# Altium PCB GP315.PcbDoc
Units mm, origin at the board's own origin, x right, y up, seen from the top; angles counter-clockwise.
Board outline 47.62 x 30.74 mm, 2 copper layers (Top Layer, Bottom Layer); 18 components, 15 nets, 48 pads, 31 vias.
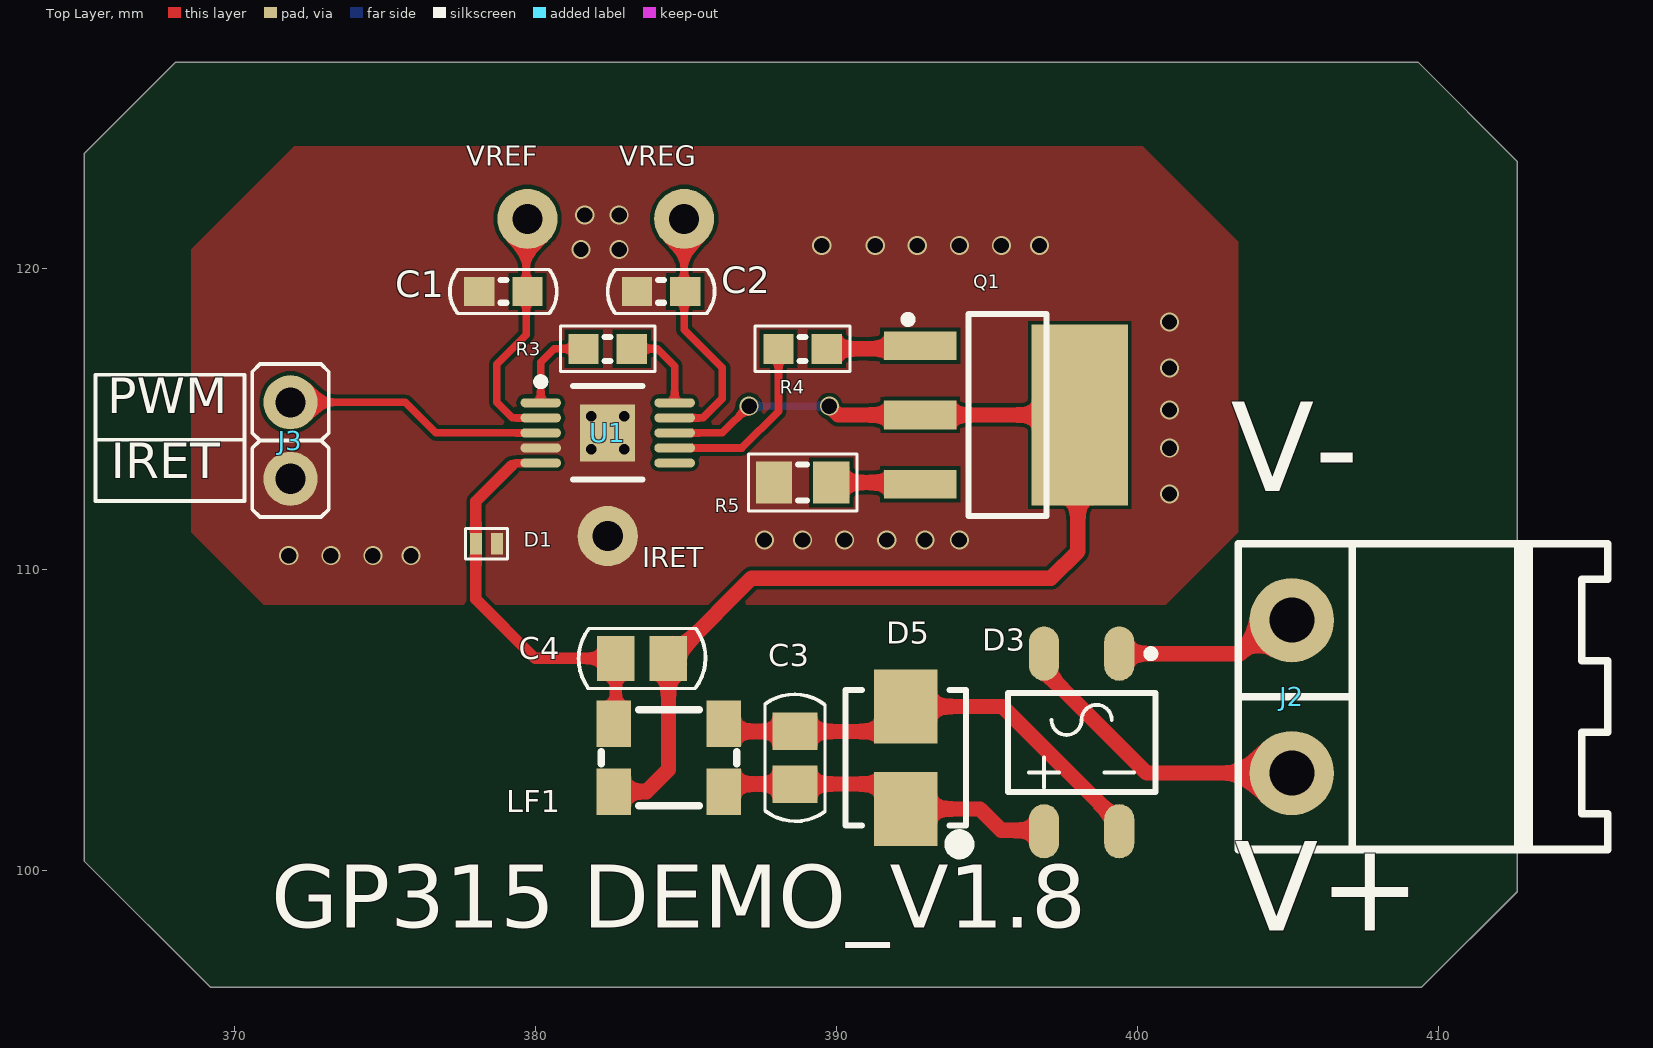
[diagram p0: Top Layer view]
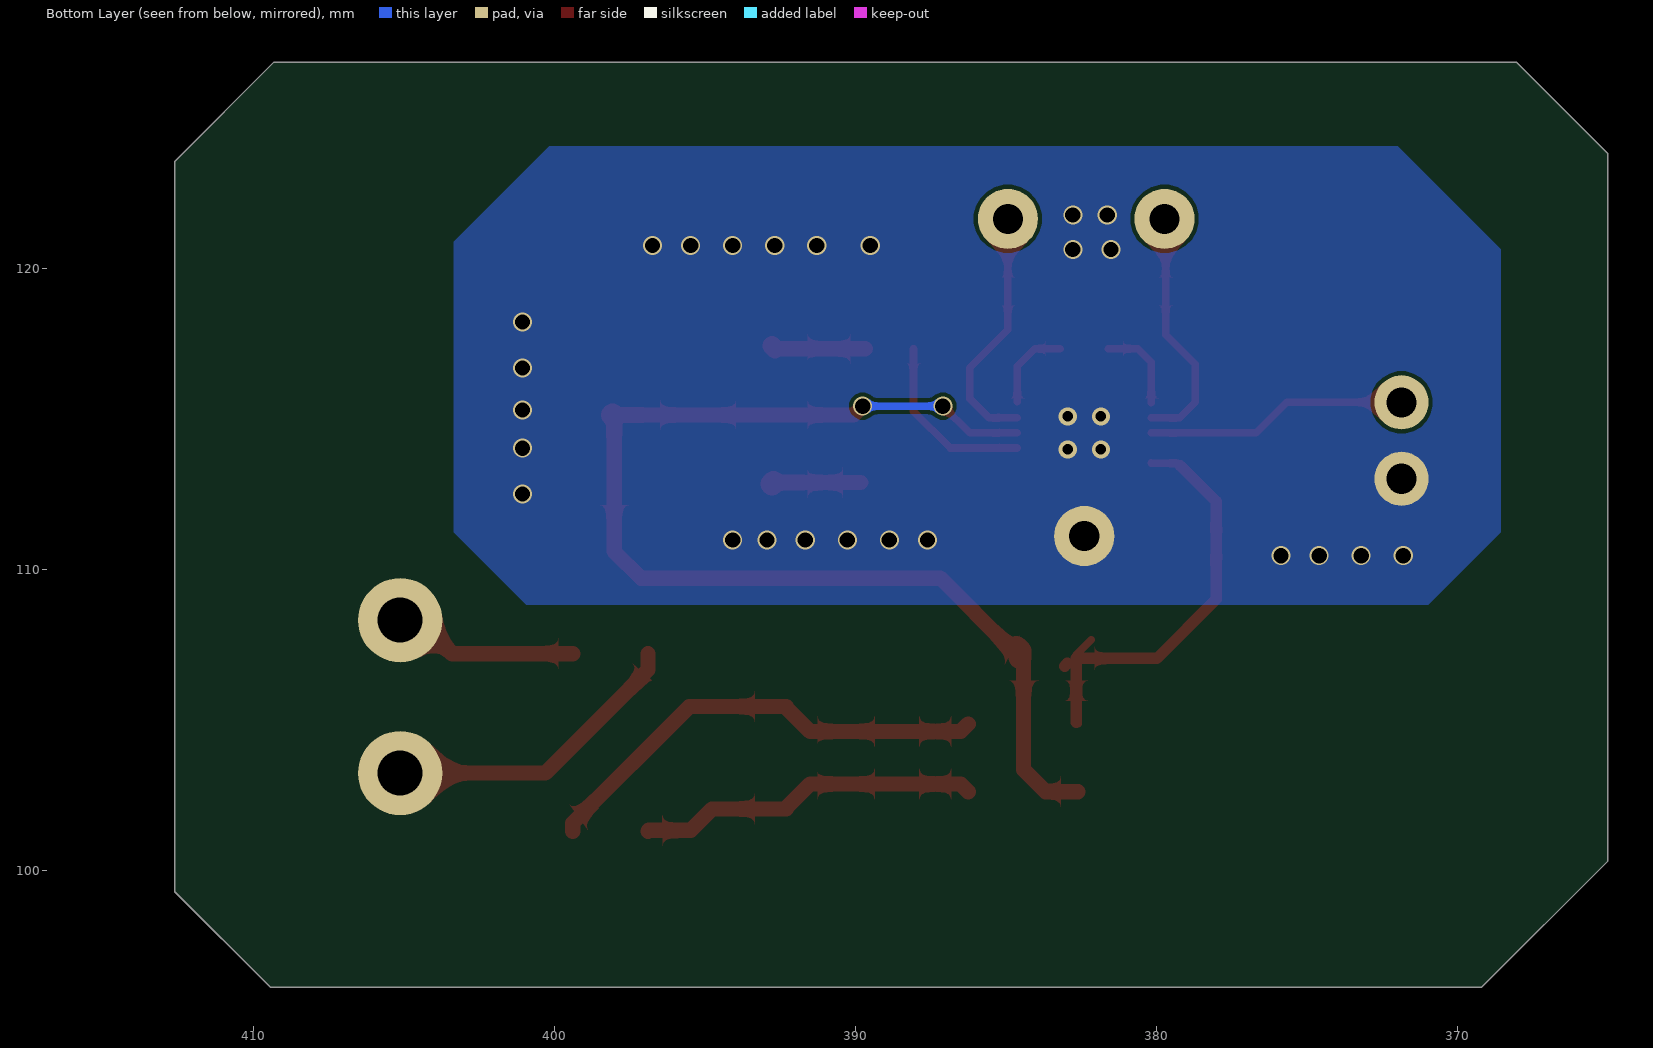
[diagram p1: Bottom Layer view, seen from below]

## Layer stack, top to bottom
Top Solder: solder mask 0.0102, Solder Resist, Dk 3.5
Top Layer: signal copper 0.0356
Dielectric 1: dielectric 0.32, FR-4, Dk 4.8
Bottom Layer: signal copper 0.0356
Bottom Solder: solder mask 0.0102, Solder Resist, Dk 3.5

## Board outline
365,100.328 365,123.827 368.046,126.873 409.321,126.873 412.619,123.575 412.619,99.31 409.446,96.137 369.191,96.137

## Design rules (kind name [scope] priority, off if disabled: settings)
Clearance [All] p1: gap=0.127 ignorepadtopadclearanceinfootprint=TRUE
ComponentClearance [All] p1: gap=-0.254 collisioncheckmode=3 verticalgap=0.254 showdistances=FALSE
PolygonConnect [All] p1: connectstyle=Direct reliefconductorwidth=0.254 reliefentries=4 polygonreliefangle="90 Angle" airgapwidth=0.254
RoutingVias [All] p1: holewidth=0.711 width=1.27 viastyle="Through Hole" minholewidth=0.711 minwidth=1.27 maxholewidth=0.711 maxwidth=1.27
SolderMaskExpansion [All] p1: expansion=0.102 istentingtop=FALSE
Width [All] p1: maxlimit=1.27 minlimit=0.127 preferedwidth=0.508 minimp=50.000000 maximp=50.000000 favimp=50.000000
29 further rules are at their usual default settings.

## Components (designator, comment, footprint, x,y, rotation, side; value= is the part's Value field where it differs from the comment)
C1 "1uf 0603" CAP_0603 378.93,119.253 r0 top
C2 "1uf 0603" CAP_0603 384.175,119.253 r180 top
C3 "10nF/50V C0805" CAP_0805 388.62,103.759 r270 top
C4 "10nF/50V C0805" CAP_0805 383.54,107.061 r0 top
D1 "H2V5L10B" DFN1006-2L_L1.0-W0.6-P0.64-BI 378.364,110.871 r180 top
D3 "MB10S" MB10S 398.145,104.267 r270 top
D5 "SMBJ28CA" DIODE_SMB 392.303,103.759 r270 top
IRET "TEST" Hole_Test 382.397,111.125 r0 top
J2 "5.08*2" 5.08_2P_W 405.13,103.251 r180 top
J3 "2.54*2" 2.54-1*2 371.856,114.3 r90 top
LF1 "L251" 共模电感 384.429,103.759 r180 top
Q1 "BCP56-16 SOT223" NPN_SOT223 395.679,115.149 r0 top
R3 "10K 0.1% R0603" RES_0603 382.397,117.348 r180 top value=1
R4 "3K 1% R0603" RES_0603 388.874,117.348 r180 top
R5 "24.9R 1% R0805" RES_0805 388.874,112.903 r180 top value="49.9R 1% R0805"
U1 "GP315" MSOP10 382.397,114.554 r0 top
VREF "TEST" Hole_Test 379.73,121.666 r180 top
VREG "TEST" Hole_Test 384.937,121.666 r180 top

## Footprints (in the part's own frame and the unit in brackets; to place one, negate y for a bottom-side part, rotate by r counter-clockwise, add the part's x,y. Pads: shape width x height; smd on the part's side, far side on the other; paste and mask are expansions set on the pad)
2.54-1*2 [mm]
  round 1.8 hole 1: 1(-1.27,0) 2(1.27,0)
  silkscreen extent -2.54,-1.27 2.54,1.27
5.08_2P_W [mm]
  round 2.8 hole 1.5: 1(0,0) 2(0,-5.08)
  silkscreen extent -10.5,-7.62 1.78,2.54
CAP_0603 [mm]
  rect 1x0.95 smd: 1(-0.8,0) 2(0.8,0)
  silkscreen extent -1.78,-0.72 1.78,0.72, body extent -0.88,-0.48 0.87,0.48, height 0.6
CAP_0805 [mm]
  rect 1.25x1.5 smd: 1(-0.875,0) 2(0.875,0)
  silkscreen extent -2.11,-1 2.11,1, body extent -1.1,-0.72 1.11,0.72, height 0.6
DFN1006-2L_L1.0-W0.6-P0.64-BI [mm]
  rect 0.4x0.7 smd paste+0.051: 1(-0.35,0) 2(0.35,0)
  silkscreen extent -0.7,-0.5 0.7,0.5
DIODE_SMB [mm] "Molded Diode, 2-Leads, Body 4.2x3.6mm, IPC Medium Density"
  rect 2.45x2.1 smd: 1(-1.7,0) 2(1.7,0)
  silkscreen extent -2.25,-2 3.12,2.03, body extent -2.25,-1.97 2.25,1.97, height 2.5
Hole_Test [mm]
  round 2 hole 1: 1(0,0)
MB10S [mm]
  oval 1.8x1 smd: 1(-2.95,1.25) 2(-2.95,-1.25) 3(2.95,-1.25) 4(2.95,1.25)
  silkscreen extent -3.07,-2.45 1.65,2.45, body extent -2.05,-2.45 2.05,2.45, height 1.1
MSOP10 [mm] "TSSOP, 10-Leads, Body 3.00x3.00mm, Pitch 0.50mm, Thermal Pad 1.89x1.83mm, IPC Medium Density"
  oval 1.35x0.3 smd: 1(-2.225,1) 2(-2.225,0.5) 3(-2.225,0) 4(-2.225,-0.5) 5(-2.225,-1) 6(2.225,-1) 7(2.225,-0.5) 8(2.225,0) 9(2.225,0.5) 10(2.225,1)
  rect 1.83x1.89 smd: 11(0,0)
  silkscreen extent -2.35,-1.55 1.15,1.82, body extent -1.55,-1.55 1.55,1.55, height 1.1
NPN_SOT223 [mm]
  rect 2.4x0.95 smd: 1(-2.9,2.3) 2(-2.9,0) 3(-2.9,-2.3)
  rect 3.2x6 smd: 4(2.4,0)
  silkscreen extent -3.43,-3.35 1.3,3.35, body extent -1.85,-3.35 1.85,3.35, height 1.7
RES_0603 [mm]
  rect 1x1 smd: 1(-0.8,0) 2(0.8,0)
  silkscreen extent -1.58,-0.75 1.57,0.75, body extent -0.88,-0.48 0.87,0.47, height 0.5
RES_0805 [mm]
  rect 1.2x1.4 smd: 1(-0.95,0) 2(0.95,0)
  silkscreen extent -1.8,-0.95 1.8,0.95, body extent -1.1,-0.7 1.1,0.7, height 0.6
共模电感 [mm]
  rect 1.15x1.55 smd: 1(-1.825,1.125) 2(-1.825,-1.125) 3(1.825,-1.125) 4(1.825,1.125)
  silkscreen extent -2.25,-1.6 2.25,1.6

## Part data
C1 C2: library part "C 0603", LatestRevisionDate=17-Jul-2002, LatestRevisionNote="Re-released for DXP Platform.", PackageDescription="Radial Cap, Thru-Hole; 2 Leads; 0.3 in Pin Spacing", PackageReference=RAD-0.3, Published=8-Jun-2000, Publisher="Altium Limited"
C3 C4: library part C0805, LatestRevisionDate=17-Jul-2002, LatestRevisionNote="Re-released for DXP Platform.", PackageDescription="Radial Cap, Thru-Hole; 2 Leads; 0.3 in Pin Spacing", PackageReference=RAD-0.3, Published=8-Jun-2000, Publisher="Altium Limited"
D1: "极性:双向;反向截止电压(Vrwm):2.5V;钳位电压:10V;峰值脉冲电流(Ipp):10A;峰值脉冲功率(Ppp):100W;击穿电压(VBR):2.8V;", Clamping Voltage=10V, JLCPCB Part Class="Extended Part", Junction Capacitance=5pF, LCSC Part Name="双向 2.5V 10A", Manufacturer=R+O(宏嘉诚), Operating Temperature=-55℃~+125℃, Peak Pulse Current (Ipp)=10A, Peak Pulse Power Dissipation (Ppp)=100W, Reverse Leakage Current (Ir)=500nA, Reverse Stand-Off Voltage (Vrwm)=2.5V, Voltage - Breakdown=2.8V, AddInBom=yes, ConvertToPcb=yes, Datasheet=https://item.szlcsc.com/datasheet/H2V5L10B/53789265.html, Device=H2V5L10B, FootprintName=DFN1006-2L_L1.0-W0.6-P0.64-BI, ManufacturerPart=H2V5L10B, Polarity=双向, Supplier=LCSC, Supplier Footprint=DFN1006-2L, SupplierPart=C51139755, Symbol=H2V5L10B, Type=ESD
D5: library part SMBJxxA, Code_JEDEC=DO-204-AH, ComponentLink1Description="Manufacturer Link", ComponentLink1URL=http://www.fairchildsemi.com/, ComponentLink2Description=Datasheet, ComponentLink2URL=http://www.fairchildsemi.com/ds/1N%2F1N4148.pdf, DatasheetVersion=1997, LatestRevisionDate=17-Jul-2002, LatestRevisionNote="Re-released for DXP Platform.", PackageDescription="Diode, Axial; Body 3.8 x 1.9 mm (LxDia. max), Lead Dia. 0.53 mm (max)", PackageReference=DO-35, Published=8-Jun-2000, Publisher="Altium Limited"
IRET VREF VREG: library part Hole
J2 J3: library part 5.08*2_W
LF1: library part 共模电感, "Transformer (Ideal)_共模电感", LatestRevisionDate=17-Jul-2002, LatestRevisionNote="Re-released for DXP Platform.", PackageDescription="Transformer; 4 Leads", PackageReference=TRF_4, Published=8-Jun-2000, Publisher="Altium Limited"
Q1: library part NPN_SOT223
R3: library part Res2, "20K 0.1% R0603", LatestRevisionDate=17-Jul-2002, LatestRevisionNote="Re-released for DXP Platform.", PackageDescription="Axial Device, Thru-Hole; 2 Leads; 0.4 in Pin Spacing", PackageReference=AXIAL-0.4, Published=8-Jun-2000, Publisher="Altium Limited"
R4 R5: library part Res2, LatestRevisionDate=17-Jul-2002, LatestRevisionNote="Re-released for DXP Platform.", PackageDescription="Axial Device, Thru-Hole; 2 Leads; 0.4 in Pin Spacing", PackageReference=AXIAL-0.4, Published=8-Jun-2000, Publisher="Altium Limited"

## Via types
v1: diameter 0.635, hole 0.508, Top Layer to Bottom Layer, 27 vias
v2: diameter 0.6, hole 0.35, Top Layer to Bottom Layer, 4 vias

## Nets (pads, with @x,y where several pads share a name; then routed paths per layer and width w, separated by ;. In a path a pad name is that pad's centre, name@x,y a point inside that pad or via, vN(x,y) a via of type N, cw(c..) or ccw(c..) an arc to the next point about the centre after c; other vN are vias at no path point)
24V+: D3.2 J2.1 | length 10.2
  Top Layer w0.508: D3.2 396.895,106.684 397.141,106.438 397.141,106.414 400.304,103.251 J2.1
24V-: D3.1 J2.2 | length 6.2
  Top Layer w0.508: D3.1 403.396,107.217 404.51,108.331 J2.2
IO: C4.1 D1.2 LF1.3 U1.5 | length 14.6
  Top Layer w0.254: 379.204,113.466 379.283,113.545 380.163,113.545 U1.5 ; C4.1@382.167,107.684 382.665,107.186 C4.1 ; LF1.3 LF1.3@382.665,104.945
  Top Layer w0.381: 379.204,113.466 378.014,112.276 D1.2 378.014,109.031 379.984,107.061 C4.1 LF1.3@382.665,104.945 ; C4.1@382.958,106.895 C4.1@383.046,106.807
IRET: C1.1 C2.2 D1.1 IRET.1 J3.1 R5.2 U1.4 U1.11
  other v1: 371.8,110.474 373.197,110.474 374.594,110.474 375.864,110.474 387.604,110.998 388.874,110.998 390.271,110.998 391.668,110.998 392.938,110.998 394.081,110.998 401.066,112.522 401.066,114.046 401.066,115.316 401.066,116.713 401.066,118.237 381.508,120.65 382.778,120.65 389.509,120.777 391.287,120.777 392.684,120.777 394.081,120.777 395.478,120.777 396.748,120.777 381.635,121.793 382.778,121.793
  other v2: 381.847,114.004 382.947,114.004 381.847,115.104 382.947,115.104
NetC1_2: C1.2 U1.2 VREF.1 | length 8.2
  Top Layer w0.254: VREF.1 379.692,121.628 379.692,118.999 379.692,117.818 378.714,116.84 378.714,115.57 379.23,115.054 U1.2
NetC2_1: C2.1 U1.9 VREG.1 | length 8.3
  Top Layer w0.254: U1.9 385.564,115.054 386.207,115.697 386.207,116.713 384.937,117.983 384.937,119.253 VREG.1
NetC3_1: C3.1 D3.4 D5.1 LF1.2 | length 15.5
  Top Layer w0.508: LF1.2 386.504,104.634 C3.1 391.507,104.634 392.303,105.43 D5.1 395.52,105.459 399.395,101.584 D3.4
NetC3_2: C3.2 D3.3 D5.2 LF1.1 | length 11.4
  Top Layer w0.508: LF1.1 386.504,102.884 C3.2 391.507,102.884 392.303,102.088 D5.2 394.765,102.059 395.478,101.346 396.866,101.346 D3.3
NetJ3_2: J3.2 U1.3 | length 8.7
  Top Layer w0.254: J3.2 375.666,115.57 376.682,114.554 U1.3
NetQ1_1: Q1.1 R4.1 | length 3.1
  Top Layer w0.508: R4.1 Q1.1@392.678,117.348
  Top Layer w0.635: Q1.1@392.678,117.348 Q1.1
NetQ1_3: Q1.3 R5.1 | length 3
  Top Layer w0.508: R5.1 Q1.3@392.725,112.903
  Top Layer w0.762: Q1.3@392.725,112.903 Q1.3
NetR3_1: R3.1 U1.10 | length 2.9
  Top Layer w0.254: R3.1 384.048,117.348 384.622,116.774 U1.10@384.622,115.585
NetR3_2: R3.2 U1.1 | length 3
  Top Layer w0.254: U1.1 380.172,116.901 380.619,117.348 R3.2
NetR4_2: R4.2 U1.7 | length 6
  Top Layer w0.254: U1.7 386.85,114.054 388.074,115.278 R4.2
V+: C4.2 LF1.4 Q1.2 Q1.4 U1.8 | length 39.2
  Top Layer w0.254: U1.8 386.207,114.554 v1(387.096,115.443)
  Top Layer w0.508: LF1.4 383.685,102.634 384.415,103.364 C4.2 ; C4.2@384.884,107.43 387.182,109.728 390.398,109.728 397.129,109.728 398.018,110.617 Q1.4@398.018,115.088 ; v1(389.763,115.443) 390.057,115.149 Q1.2 Q1.4
  Top Layer w0.762: C4.2@384.54,107.086 384.54,107.311 C4.2@384.659,107.43 ; Q1.4@398.018,115.088 Q1.4
  Bottom Layer w0.254: v1(387.096,115.443) v1(389.763,115.443)
pads on no net: U1.6

## Polygon pours and split planes (outlines as drawn)
IRET on Top Layer "IRET_L01_P000" (solid, pour order 0): 400.177,124.079 403.352,120.904 403.352,111.252 400.939,108.839 370.967,108.839 368.554,111.252 368.554,120.65 371.983,124.079 372.872,124.079
IRET on Bottom Layer "IRET_L02_P001" (solid, pour order 1): 400.177,124.079 403.352,120.904 403.352,111.252 400.939,108.839 370.967,108.839 368.554,111.252 368.554,120.65 371.983,124.079 372.11,124.079

## Silkscreen, mask and mechanical layers (free items; w line width, h text height)
Top Overlay:
  lines w0.127: 365.371,114.325 370.332,114.325 ; 365.379,112.293 370.332,112.293 370.332,116.484 365.379,116.484 365.379,112.293
  text "PWM" at 365.76,114.808 h2.03
  text "IRET" at 365.887,112.649 h2.03
  text "V-" at 403.098,111.633 h5.08
  text "GP315 DEMO_V1.8" at 371.221,97.409 h3.6
  text "V+" at 403.225,97.028 h5.08
Bottom Paste:
  region: 400.177,111.633 400.177,118.745 394.081,118.745 394.081,111.633
Bottom Solder:
  region: 400.177,111.633 400.177,118.745 394.081,118.745 394.081,111.633
Mechanical 1:
  lines w0.127: 406.781,126.873 407.162,126.873 ; 365,100.328 365,123.827 368.046,126.873 409.321,126.873 412.619,123.575 412.619,115.075 412.619,99.31 409.446,96.137 369.191,96.137 365,100.328